# Altium PCB DumbWatch.PcbDoc (part 1 of 2)
Units mil, origin at the board's own origin, x right, y up, seen from the top; angles counter-clockwise.
Board outline 1299.21 x 1299.21 mil, 4 copper layers (Top Layer, Layer 1, Layer 2, Bottom Layer), stack 41.778 mil thick; 57 components, 41 nets, 178 pads, 101 vias.
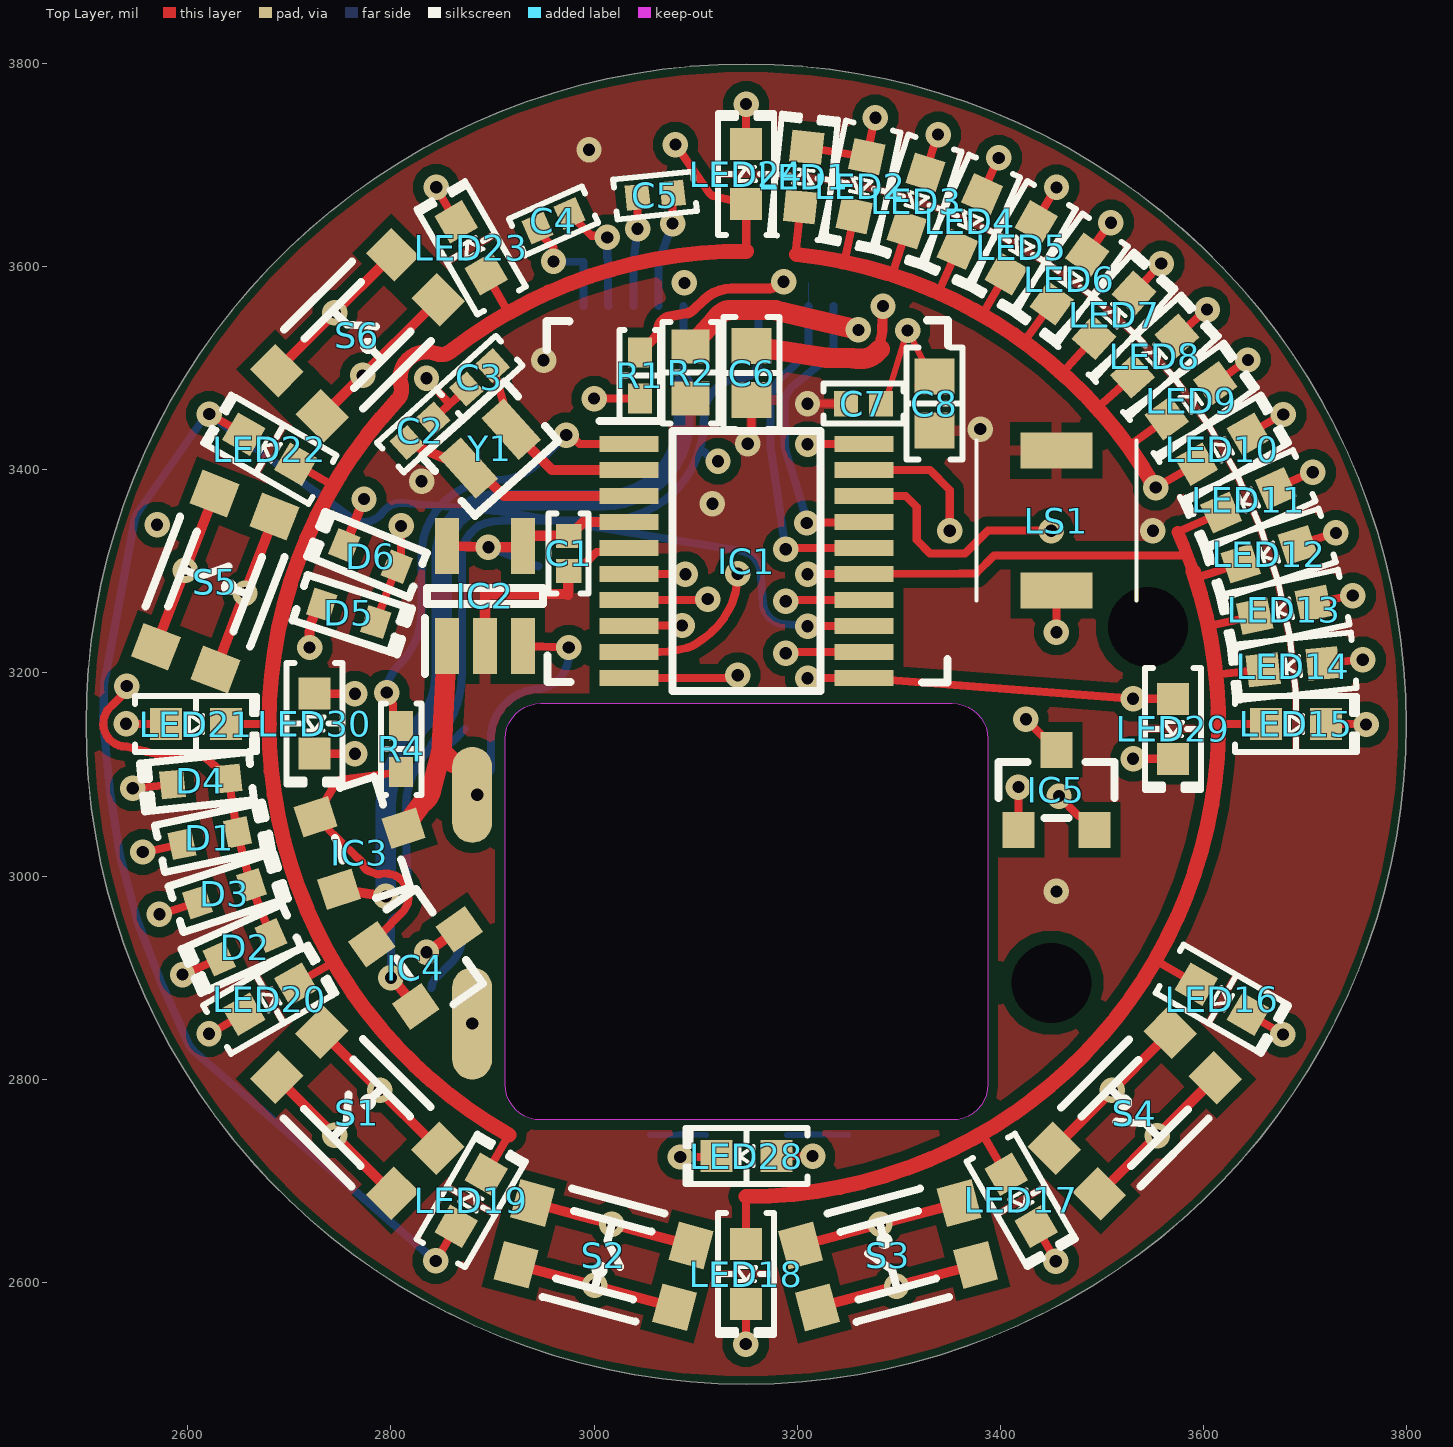
[diagram p0: Top Layer view]
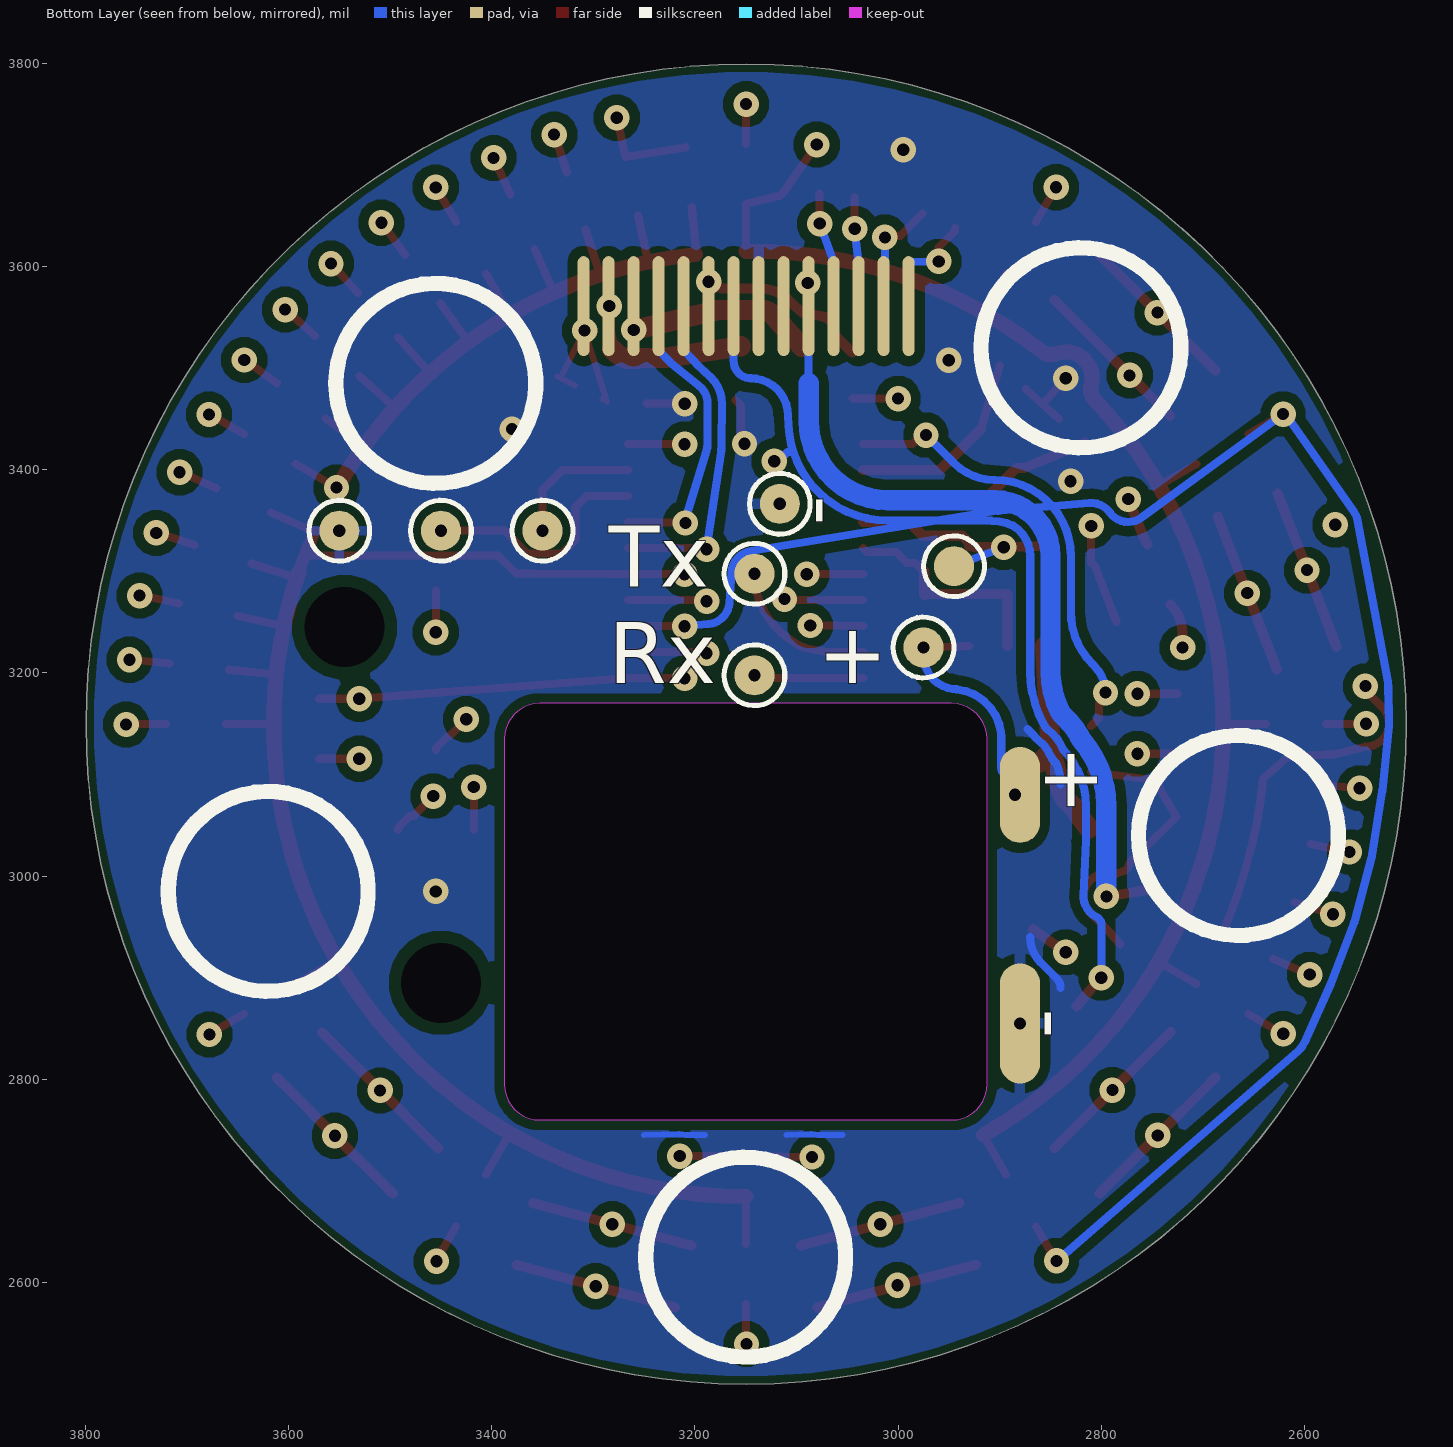
[diagram p1: Bottom Layer view, seen from below]
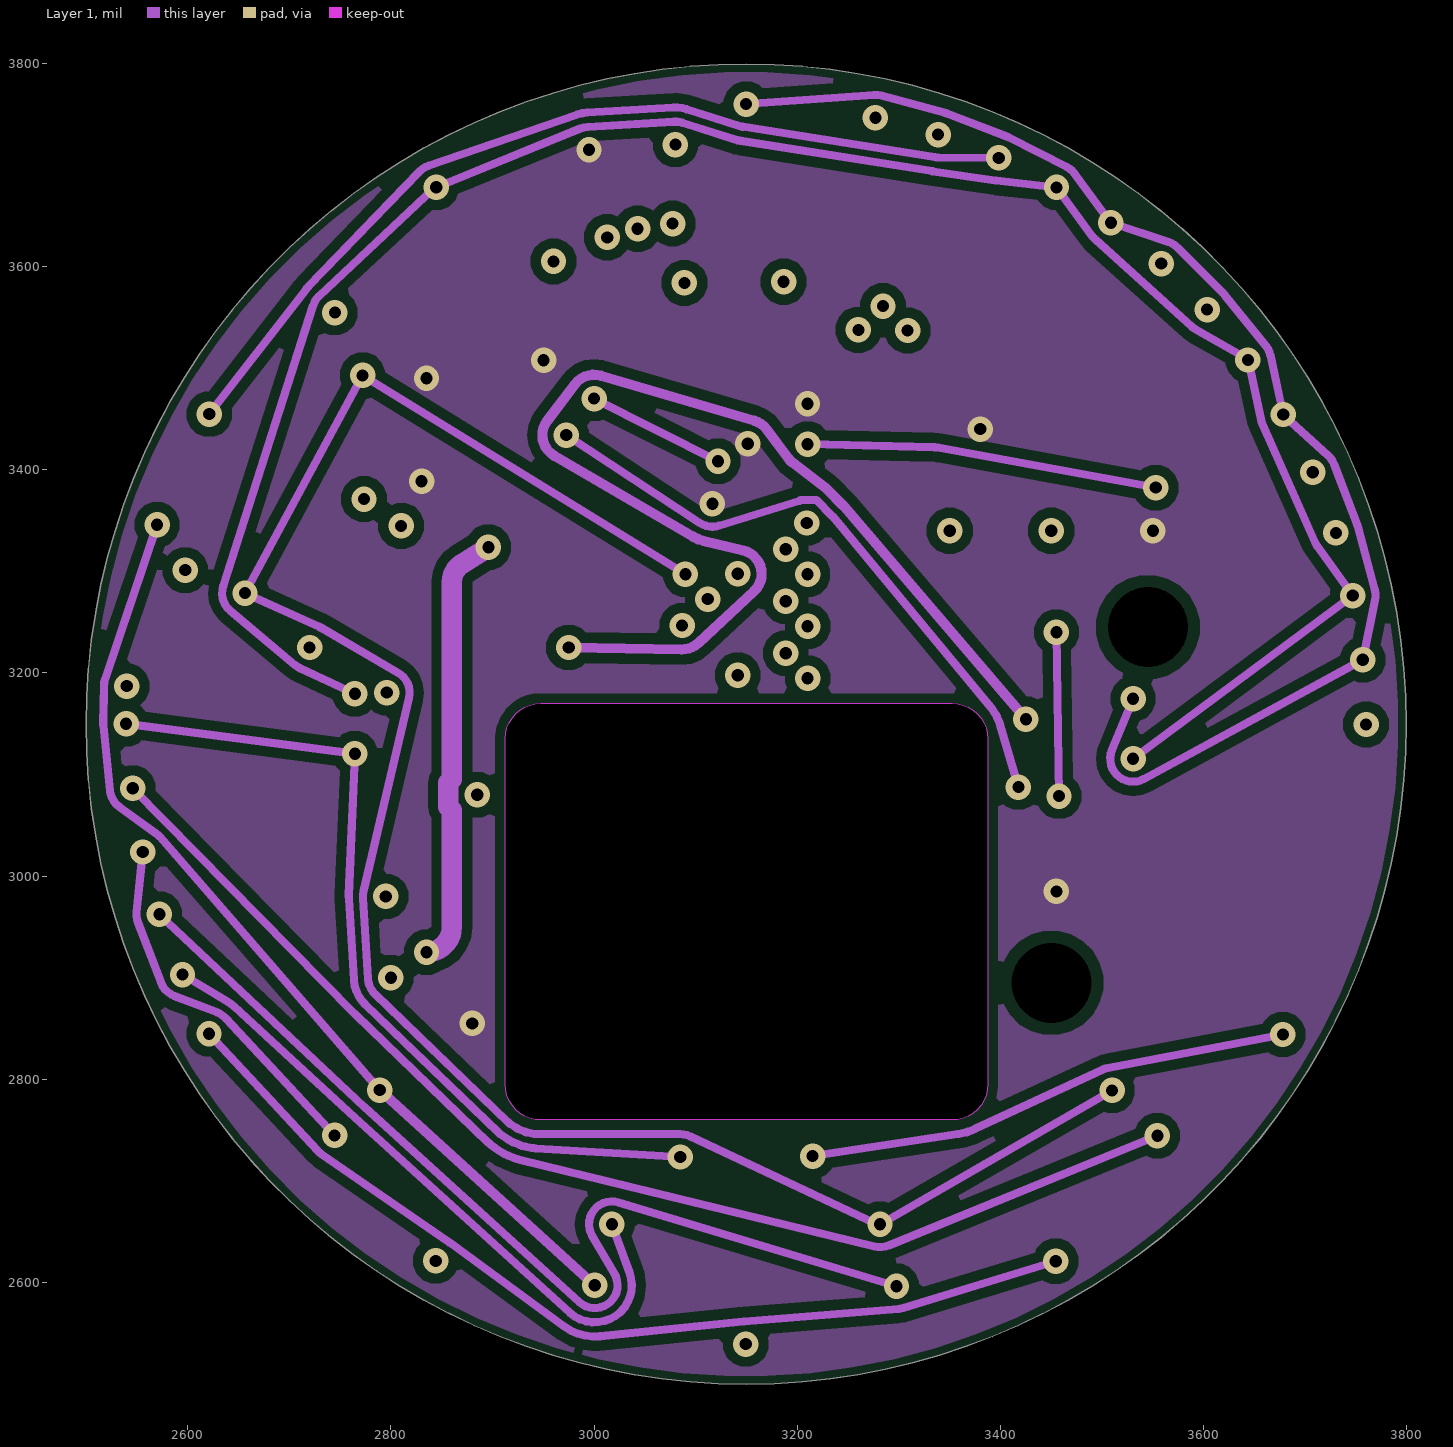
[diagram p2: Layer 1]
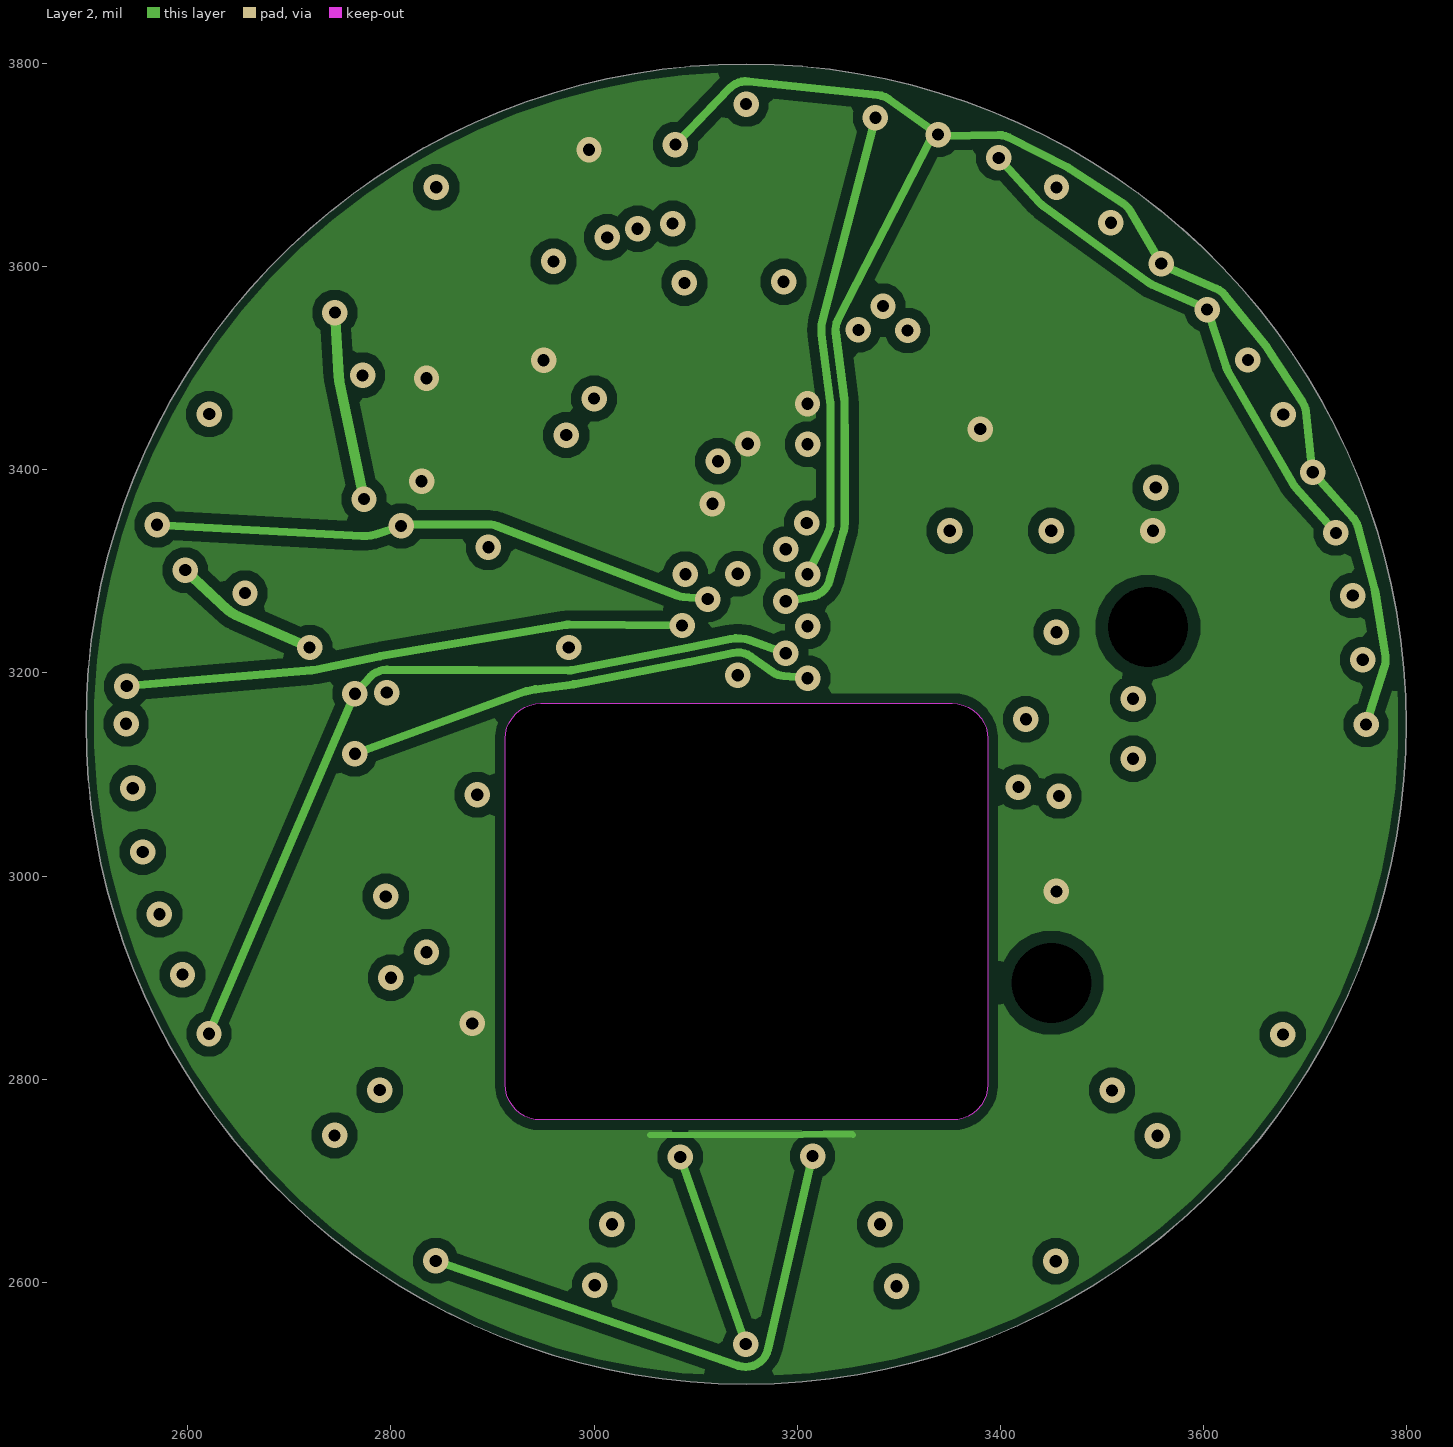
[diagram p3: Layer 2]

## Layer stack, top to bottom
Top Solder: solder mask 0.4, Solder Resist, Dk 3.5
Top Layer: signal copper 1.4
Dielectric 2: prepreg 11.811, PP-006, Dk 4.1
Layer 1: signal copper 1.378
Dielectric 1: dielectric 12.6, FR-4, Dk 4.8
Layer 2: signal copper 1.378
Dielectric 3: prepreg 11.811, PP-006, Dk 4.1
Bottom Layer: signal copper 1.4
Bottom Solder: solder mask 0.4, Solder Resist, Dk 3.5

## Board outline
3149.61,2500 cw(c3149.61,3149.61) 2500,3149.61 cw(c3149.61,3149.61) 3149.61,3799.21 cw(c3149.61,3149.61) 3799.21,3149.61 cw(c3149.61,3149.61)
cut-out: 2947.5,3170 3352.5,3170 cw(c3352.5,3135) 3387.5,3135 3387.5,2795 cw(c3352.5,2795) 3352.5,2760 2947.5,2760 cw(c2947.5,2795) 2912.5,2795 2912.5,3135 cw(c2947.5,3135)

## Design rules (kind name [scope] priority, off if disabled: settings)
BoardOutlineClearance [All] p1: gap=8 ignorepadtopadclearanceinfootprint=FALSE
Clearance [All] p1: gap=10 ignorepadtopadclearanceinfootprint=FALSE except(6: Arc-Arc Arc-Track Arc-THPad Arc-Via Arc-Text Track-Track Track-THPad Track-Via Track-Text SMDPad-SMDPad SMDPad-THPad SMDPad-Via SMDPad-Text THPad-THPad THPad-Via THPad-Text Via-Via Via-Text Fill-Text Poly-Text Region-Text Text-Text; 8: Arc-SMDPad Track-SMDPad; 12: Arc-Hole Track-Hole SMDPad-Hole THPad-Hole Via-Hole Fill-Hole Poly-Hole Region-Hole Text-Hole)
PolygonConnect [All] p1: thpad.connectstyle=Relief thpad.reliefconductorwidth=10 thpad.reliefentries=4 thpad.polygonreliefangle="90 Angle" thpad.airgapwidth=10 smdpad.connectstyle=Relief smdpad.reliefconductorwidth=10 smdpad.reliefentries=4 smdpad.polygonreliefangle="90 Angle" smdpad.airgapwidth=10 via.connectstyle=Direct via.reliefconductorwidth=10 via.reliefentries=4 via.polygonreliefangle="90 Angle" via.airgapwidth=10
RoutingVias [All] p1: holewidth=12 width=25 viastyle="Through Hole" minholewidth=12 minwidth=25 maxholewidth=12 maxwidth=25
SolderMaskExpansion [All] p1: expansion=4 istentingtop=FALSE
Width [All] p1: maxlimit=40 minlimit=6 preferedwidth=6
30 further rules are at their usual default settings.

## Components (designator, comment, footprint, x,y, rotation, side; value= is the part's Value field where it differs from the comment)
C1 "0.1 µF" "CAP 0402_1005" 2975,3317.68 r90 top
C2 "9 pF" "CAP 0402_1005" 2828.77,3438.33 r42 top
C3 "9 pF" "CAP 0402_1005" 2887.14,3490.89 r222 top
C4 "1 µF" "CAP 0402_1005" 2960,3645 r204 top
C5 "1 µF" "CAP 0402_1005" 3060,3670 r186 top
C6 "4.7 µF" "CAP 0603_1608" 3155,3495 r90 top
C7 "0.1 µF" "CAP 0402_1005" 3265,3465 r0 top
C8 "4.7 µF" "CAP 0603_1608" 3335,3465 r90 top
D1 "1N4148X-TP" SOD-523 2621.64,3037.38 r12 top
D2 "1N4148X-TP" SOD-523 2656.51,2930.06 r204 top
D3 "1N4148X-TP" SOD-523 2636.26,2982.81 r18 top
D4 "1N4148X-TP" SOD-523 2612.8,3093.19 r186 top
D5 "1N4148X-TP" SOD-523 2758.42,3258.64 r342 top
D6 "1N4148X-TP" SOD-523 2780,3315 r158 top
IC1 "STM32G031F8P6" CLT34BT6 3150,3310 r0 top
IC2 "ME6211C33M5G-N" SOT95P270X145-5N 2892.6,3275.79 r90 top
IC3 "DMP1045U-7" "DIODES SOT-23-3" 2775,3035 r18 top
IC4 "DMP1045U-7" "DIODES SOT-23-3" 2835,2925 r35.13 top
IC5 "DMP1045U-7" "DIODES SOT-23-3" 3455,3085 r90 top
LED1 "Yellow" "LED 0603_1608 YELLOW" 3206.19,3687.98 r84 top
LED2 "Yellow" "LED 0603_1608 YELLOW" 3262.16,3679.12 r258 top
LED3 "Yellow" "LED 0603_1608 YELLOW" 3316.89,3664.45 r252 top
LED4 "Yellow" "LED 0603_1608 YELLOW" 3369.79,3644.14 r246 top
LED5 "Yellow" "LED 0603_1608 YELLOW" 3420.28,3618.42 r240 top
LED6 "Yellow" "LED 0603_1608 YELLOW" 3467.8,3587.56 r234 top
LED7 "Yellow" "LED 0603_1608 YELLOW" 3511.83,3551.9 r48 top
LED8 "Yellow" "LED 0603_1608 YELLOW" 3551.9,3511.83 r42 top
LED9 "Yellow" "LED 0603_1608 YELLOW" 3587.56,3467.8 r36 top
LED10 "Yellow" "LED 0603_1608 YELLOW" 3618.42,3420.28 r30 top
LED11 "Yellow" "LED 0603_1608 YELLOW" 3644.14,3369.79 r204 top
LED12 "Yellow" "LED 0603_1608 YELLOW" 3664.45,3316.89 r198 top
LED13 "Yellow" "LED 0603_1608 YELLOW" 3679.12,3262.16 r192 top
LED14 "Yellow" "LED 0603_1608 YELLOW" 3687.98,3206.19 r186 top
LED15 "Yellow" "LED 0603_1608 YELLOW" 3690.94,3149.61 r0 top
LED16 "Yellow" "LED 0603_1608 YELLOW" 3618.42,2878.94 r330 top
LED17 "Yellow" "LED 0603_1608 YELLOW" 3420.28,2680.79 r300 top
LED18 "Yellow" "LED 0603_1608 YELLOW" 3149.61,2608.27 r270 top
LED19 "Yellow" "LED 0603_1608 YELLOW" 2878.93,2680.8 r60 top
LED20 "Yellow" "LED 0603_1608 YELLOW" 2680.79,2878.94 r30 top
LED21 "Yellow" "LED 0603_1608 YELLOW" 2608.27,3149.61 r0 top
LED22 "Yellow" "LED 0603_1608 YELLOW" 2680.79,3420.28 r150 top
LED23 "Yellow" "LED 0603_1608 YELLOW" 2878.94,3618.42 r120 top
LED24 "Yellow" "LED 0603_1608 YELLOW" 3149.61,3690.94 r90 top
LED28 "Yellow" "LED 0603_1608 YELLOW" 3150,2724.45 r180.05 top
LED29 "Yellow" "LED 0603_1608 YELLOW" 3570,3145 r270 top
LED30 "Yellow" "LED 0603_1608 YELLOW" 2725,3150 r270 top
LS1 "GSC4317YA-16R4000" GSC4317YA16R4000 3455,3350 r90 top
R1 "5.6 kOhms" "RES 0402_1005" 3045,3492.64 r90 top
R2 "1 MOhms" "RES 0603_1608" 3095,3495.59 r90 top
R4 "5.6 kOhms" "RES 0402_1005" 2810,3125 r270 top
S1 "KMR741NG ULC LFS" "C&K KMR7" 2766.81,2767.1 r314.98 top
S2 "KMR741NG ULC LFS" "C&K KMR7" 3009.35,2626.95 r164.98 top
S3 "KMR741NG ULC LFS" "C&K KMR7" 3289.47,2626.84 r14.98 top
S4 "KMR741NG ULC LFS" "C&K KMR7" 3532.11,2766.81 r44.98 top
S5 "KMR741NG ULC LFS" "C&K KMR7" 2626.95,3289.86 r248.98 top
S6 "KMR741NG ULC LFS" "C&K KMR7" 2767.1,3532.4 r224.98 top
Y1 "32.768 kHz" "ABRACON ABS06" 2897.32,3420.8 r222 top

## Footprints (in the part's own frame and the unit in brackets; to place one, negate y for a bottom-side part, rotate by r counter-clockwise, add the part's x,y. Pads: shape width x height; smd on the part's side, far side on the other; paste and mask are expansions set on the pad)
"ABRACON ABS06" [mm] "Crystal, 2-Leads, Body 1.20x2.00mm, Pitch 1.50mm, IPC Medium Density"
  rect 0.75x1.4 smd: 1(-0.725,0) 2(0.725,0)
  silkscreen extent -1.4,-1 1.4,1, body extent -1.02,-0.62 1.03,0.63, height 0.6
"C&K KMR7" [mm] "T-Switch, 4-leads, body 4.2x2.8mm, C&K KMR741NG ULC LFS"
  rect 0.9x1 smd mask+0.1: 1(-2.05,0.8) 2(2.05,0.8) 3(-2.05,-0.8) 4(2.05,-0.8)
  silkscreen extent -1.2,-1.4 1.2,1.4, body extent -2.3,-1.4 2.3,1.4, height 2.5
"CAP 0402_1005" [mm] "Chip Capacitor, 2-Leads, Body 1.02x0.51mm, IPC Medium Density"
  rect 0.6x0.64 smd: 1(-0.44,0) 2(0.44,0)
  silkscreen extent -1,-0.5 1,0.5, body extent -0.5,-0.26 0.5,0.26, height 0.52
"CAP 0603_1608" [mm] "Chip Capacitor, 2-Leads, Body 1.60x0.80mm, IPC Medium Density"
  rect 0.9x1 smd: 1(-0.675,0) 2(0.675,0)
  silkscreen extent -1.4,-0.7 1.4,0.7, body extent -0.8,-0.41 0.8,0.41, height 0.82
CLT34BT6 [mm]
  rect 1.475x0.4 smd: 1(-2.938,2.925) 2(-2.938,2.275) 3(-2.938,1.625) 4(-2.938,0.975) 5(-2.938,0.325) 6(-2.938,-0.325) 7(-2.938,-0.975) 8(-2.938,-1.625) 9(-2.938,-2.275) 10(-2.938,-2.925) 11(2.938,-2.925) 12(2.938,-2.275) 13(2.938,-1.625) 14(2.938,-0.975) 15(2.938,-0.325) 16(2.938,0.325) 17(2.938,0.975) 18(2.938,1.625) 19(2.938,2.275) 20(2.938,2.925)
  silkscreen extent -3.67,-3.25 1.85,3.5, body extent -3.2,-3.25 3.2,3.25, height 1.2
"DIODES SOT-23-3" [mm] "SOT23, 3-Leads, Body 2.90x2.40mm, Pitch 0.95mm, IPC Medium Density"
  rect 0.9x0.8 smd: 1(-1,0.95) 2(-1,-0.95) 3(1,0)
  silkscreen extent -0.7,-1.45 0.7,1.45, body extent -1.41,-1.45 1.41,1.45, height 1.5
GSC4317YA16R4000 [mm]
  rect 0.9x1.8 smd: 1(-1.75,0) 2(1.75,0)
  silkscreen extent -2,-2 2,2, body extent -2.11,-2 2.11,2, height 2.1
"LED 0603_1608 YELLOW" [mm] "Chip Diode, 2-Leads, Body 1.60x0.80mm, IPC Medium Density"
  rect 0.8x0.8 smd: 1(-0.75,0) 2(0.75,0)
  silkscreen extent -1.52,-0.7 1.52,0.7, body extent -0.8,-0.4 0.8,0.4, height 0.53
"RES 0402_1005" [mm] "Chip Resistor, 2-Leads, Body 1.0x0.5mm, IPC Medium Density"
  rect 0.75x0.6 smd: 1(-0.575,0) 2(0.575,0)
  silkscreen extent -1.14,-0.51 1.14,0.51, body extent -0.5,-0.25 0.5,0.25, height 0.35
"RES 0603_1608" [mm] "Chip Resistor, 2-Leads, Body 1.60x0.80mm, IPC Medium Density"
  rect 0.85x0.95 smd: 1(-0.65,0) 2(0.65,0)
  silkscreen extent -1.27,-0.7 1.27,0.7, body extent -0.8,-0.4 0.8,0.4, height 0.45
SOD-523 [mm] "Molded Diode, 2-Leads, Body 1.60x0.80mm, IPC Medium Density"
  rect 0.6x0.7 smd: 1(-0.71,0) 2(0.71,0)
  silkscreen extent -1.28,-0.6 1.47,0.6, body extent -0.8,-0.4 0.8,0.4, height 0.82
SOT95P270X145-5N [mm]
  rect 1.4x0.6 smd: 1(-1.25,0.95) 2(-1.25,0) 3(-1.25,-0.95) 4(1.25,-0.95) 5(1.25,0.95)
  silkscreen extent -1.95,-1.45 0.2,1.5, body extent -1.35,-1.45 1.35,1.45, height 1.45

## Part data
C1 C7: library part C0402C104M3PAC7867, "CAP CER 0.1UF 25V X5R 0402", Device Package="0402 (1005 Metric)", Manufacturer=KEMET, Operating Temperature="-55°C ~ 85°C", Supplier Part Number 1=399-15637-1-ND, Temperature Coefficient=X5R, Tolerance=±20%, Voltage - Rated=25V, Applications="Bypass, Decoupling", Capacitance="0.1 µF", ComponentLink1Description=Datasheet, ComponentLink1URL=https://api.kemet.com/component-edge/download/datasheet/C0402C104M3PAC7867.pdf, ComponentLink2Description="DigiKey Link", ComponentLink2URL=https://www.digikey.com/en/products/detail/kemet/C0402C104M3PAC7867/7390685, LastUpdated="4/6/2026 7:11:09 PM", Lifecycle Status=Active, Minimum Order=1, Mounting Type="Surface Mount, MLCC", Package / Case="0402 (1005 Metric)", Packaging=TapeAndReel, Part Number=C0402C104M3PAC7867, Part Status=Active, PartId=2096, Price=0.01, Series="SMD Comm X5R", Size / Dimension="0.039\" L x 0.020\" W (1.00mm x 0.50mm)", Supplier 1=DigiKey, Thickness (Max)="0.022\" (0.55mm)"
C2 C3: library part GCQ1555C1H9R0BB01D, "CAP CER 9PF 50V C0G/NP0 0402", Device Package="0402 (1005 Metric)", Manufacturer="Murata Electronics", Operating Temperature="-55°C ~ 125°C", Ratings=AEC-Q200, Supplier Part Number 1=490-17523-1-ND, Temperature Coefficient="C0G, NP0", Tolerance=±0.1pF, Voltage - Rated=50V, Applications="RF, Microwave, High Frequency, Automotive", Capacitance="9 pF", ComponentLink1Description=Datasheet, ComponentLink1URL=https://search.murata.co.jp/Ceramy/image/img/A01X/G101/ENG/GCQ1555C1H9R0BB01-01.pdf, ComponentLink2Description="DigiKey Link", ComponentLink2URL=https://www.digikey.com/en/products/detail/murata-electronics/GCQ1555C1H9R0BB01D/7803116, LastUpdated="4/6/2026 7:10:26 PM", Lifecycle Status=Active, Minimum Order=1, Mounting Type="Surface Mount, MLCC", Package / Case="0402 (1005 Metric)", Packaging=TapeAndReel, Part Number=GCQ1555C1H9R0BB01D, Part Status=Active, PartId=12256, Price=0.04, Series=GCQ, Size / Dimension="0.039\" L x 0.020\" W (1.00mm x 0.50mm)", Supplier 1=DigiKey, Thickness (Max)="0.022\" (0.55mm)"
C4 C5: library part GMC04X5R105K25NT, "CAP0402 X5R 1UF 10% 25V", Device Package="0402 (1005 Metric)", Manufacturer="Cal-Chip Electronics, Inc.", Operating Temperature="-55°C ~ 85°C", Supplier Part Number 1=4713-GMC04X5R105K25NTCT-ND, Temperature Coefficient=X5R, Tolerance=±10%, Voltage - Rated=25V, Applications="General Purpose", Capacitance="1 µF", ComponentLink1Description=Datasheet, ComponentLink1URL=https://calchip.com/wp-content/uploads/2023/09/GMC-Series-2.pdf, ComponentLink2Description="DigiKey Link", ComponentLink2URL=https://www.digikey.com/en/products/detail/cal-chip-electronics-inc/GMC04X5R105K25NT/23571683, LastUpdated="4/6/2026 7:07:11 PM", Lifecycle Status=Active, Minimum Order=1, Mounting Type="Surface Mount, MLCC", Package / Case="0402 (1005 Metric)", Packaging=TapeAndReel, Part Number=GMC04X5R105K25NT, PartId=62676, Price=0.01, Series=GMC, Size / Dimension="0.039\" L x 0.020\" W (1.00mm x 0.50mm)", Supplier 1=DigiKey, Thickness (Max)="0.022\" (0.55mm)"
C6 C8: library part CL10A475KA8NQNC, "CAP CER 4.7UF 25V X5R 0603", Device Package="0603 (1608 Metric)", Manufacturer="Samsung Electro-Mechanics", Operating Temperature="-55°C ~ 85°C", Supplier Part Number 1=1276-1900-1-ND, Temperature Coefficient=X5R, Tolerance=±10%, Voltage - Rated=25V, Applications="General Purpose", Capacitance="4.7 µF", ComponentLink1Description=Datasheet, ComponentLink1URL=http://www.samsungsem.com/kr/support/product-search/mlcc/CL10A475KA8NQNC.jsp, ComponentLink2Description="DigiKey Link", ComponentLink2URL=https://www.digikey.com/en/products/detail/samsung-electro-mechanics/CL10A475KA8NQNC/3887558, LastUpdated="4/6/2026 7:23:52 PM", Lifecycle Status=Active, Minimum Order=1, Mounting Type="Surface Mount, MLCC", Package / Case="0603 (1608 Metric)", Packaging=TapeAndReel, Part Number=CL10A475KA8NQNC, Part Status=Active, PartId=2349, Price=0.06, Series=CL, Size / Dimension="0.063\" L x 0.031\" W (1.60mm x 0.80mm)", Supplier 1=DigiKey, Thickness (Max)="0.035\" (0.90mm)"
D1 D2 D3 D4 D5 D6: "DIODE GEN PURP 75V 150MA SOD523", Capacitance @ Vr, F="2pF @ 0V, 1MHz", Current - Average Rectified (Io)=150mA, Current - Reverse Leakage @ Vr="1 µA @ 75 V", Manufacturer="Micro Commercial Co", Operating Temperature - Junction="-65°C ~ 150°C", Package / Case="SC-79, SOD-523", Supplier Device Package=SOD-523, Supplier Part Number 1=1N4148XTPMSCT-ND, Voltage - DC Reverse (Vr) (Max)="75 V", Voltage - Forward (Vf) (Max) @ If="1.25 V @ 150 mA", ComponentLink1Description=Datasheet, ComponentLink1URL=https://www.mccsemi.com/pdf/Products/1N4148X(SOD-523).PDF, ComponentLink2Description="DigiKey Link", ComponentLink2URL=https://www.digikey.com/en/products/detail/micro-commercial-co/1N4148X-TP/789328, Diode Type=Standard, LastUpdated="4/5/2026 8:44:43 PM", Lifecycle Status=Active, Minimum Order=1, Mounting Type="Surface Mount", Packaging=TapeAndReel, Part Number=1N4148X-TP, Part Status=Active, PartId=2733, Price=0.02, Reverse Recovery Time (trr)="4 ns", Series=-, Speed="Small Signal =< 200mA (Io), Any Speed", Supplier 1=DigiKey
IC1: "Integrated Circuit", Manufacturer_Name=STMicroelectronics, Mouser Part Number=511-STM32G031F8P6, Arrow Part Number=STM32G031F8P6, Arrow Price/Stock=https://www.arrow.com/en/products/stm32g031f8p6/stmicroelectronics.html?utm_currency=USD&region=asia, Datasheet Link=https://www.st.com/resource/en/datasheet/stm32g031c6.pdf, Height=1.2mm, Manufacturer_Part_Number=STM32G031F8P6, Mouser Price/Stock=https://www.mouser.co.uk/ProductDetail/STMicroelectronics/STM32G031F8P6?qs=uwxL4vQweFPCanBqg1D5fQ%3D%3D
IC2: "Integrated Circuit", Manufacturer_Name=Microne, Datasheet Link=https://datasheet.lcsc.com/szlcsc/1811131510_MICRONE-Nanjing-Micro-One-Elec-ME6211C33M5G-N_C82942.pdf, Height=1.45mm, Manufacturer_Part_Number=ME6211C33M5G-N
IC3 IC4 IC5: "MOSFET P-CH 12V 4A SOT23", Current - Continuous Drain (Id) @ 25°C="4A (Ta)", Drain to Source Voltage (Vdss)="12 V", Drive Voltage (Max Rds On,  Min Rds On)="1.8V, 4.5V", Input Capacitance (Ciss) (Max) @ Vds="1357 pF @ 10 V", Manufacturer="Diodes Incorporated", Operating Temperature="-55°C ~ 150°C (TJ)", Package / Case="TO-236-3, SC-59, SOT-23-3", Power Dissipation (Max)="800mW (Ta)", Supplier Device Package=SOT-23-3, Supplier Part Number 1=DMP1045U-7DICT-ND, ComponentLink1Description=Datasheet, ComponentLink1URL=https://www.diodes.com/assets/Datasheets/DMP1045U.pdf, ComponentLink2Description="DigiKey Link", ComponentLink2URL=https://www.digikey.com/en/products/detail/diodes-incorporated/DMP1045U-7/4249936, FET Type=P-Channel, Gate Charge (Qg) (Max) @ Vgs="15.8 nC @ 4.5 V", LastUpdated="2/8/2024 9:46:13 PM", Lifecycle Status=Active, Minimum Order=1, Mounting Type="Surface Mount", Packaging=TapeAndReel, Part Number=DMP1045U-7, Part Status=Active, Price=0.07, Rds On (Max) @ Id, Vgs="31mOhm @ 4A, 4.5V", Series=-, Supplier 1=DigiKey, Technology="MOSFET (Metal Oxide)", Vgs (Max)=±8V, Vgs(th) (Max) @ Id="1V @ 250µA"
LED1 LED2 LED3 LED4 LED5 LED6 LED7 LED8 LED9 LED10 LED11 LED12 LED13 LED14 LED15 LED16 LED17 LED18 LED19 LED20 LED21 LED22 LED23 LED24 LED28 LED29 LED30: library part QBLP601-Y5-2897, "0603 LED YELLOW 590NM, CLEAR LEN", Current - Test=5mA, Device Package="0603 (1608 Metric)", Lens Color=Colorless, Manufacturer="QT Brightek (QTB)", Millicandela Rating=104mcd, Supplier Device Package=0603, Supplier Part Number 1=1516-QBLP601-Y5-2897CT-ND, Voltage - Forward (Vf) (Typ)=1.9V, Color=Yellow, ComponentLink1Description=Datasheet, ComponentLink1URL=https://www.qt-brightek.com/datasheet/QBLP601-Y5-2897.pdf, ComponentLink2Description="DigiKey Link", ComponentLink2URL=https://www.digikey.com/en/products/detail/qt-brightek-qtb/QBLP601-Y5-2897/22106639, Configuration=Standard, Height (Max)=0.70mm, LastUpdated="4/5/2026 8:39:54 PM", Lens Size="1.10mm x 0.80mm", Lens Style="Rectangle with Flat Top", Lens Transparency=Clear, Lifecycle Status=Active, Minimum Order=1, Mounting Type="Surface Mount", Package / Case="0603 (1608 Metric)", Packaging=TapeAndReel, Part Number=QBLP601-Y5-2897, PartId=1491, Price=0.06, Series=QBLP601, Size / Dimension="1.60mm L x 0.80mm W", Supplier 1=DigiKey, Viewing Angle=140°, Wavelength - Dominant=590nm, Wavelength - Peak=592nm
LS1: "Loudspeaker or Buzzer", Manufacturer_Name=INGHAi, Datasheet Link=https://datasheet.lcsc.com/szlcsc/1810191428_INGHAi-GSC4317YA-16R4000_C255307.pdf, Height=2mm, Manufacturer_Part_Number=GSC4317YA-16R4000
R1 R4: library part CR0402-FX-5601GLF, "RES SMD 5.6K OHM 1% 1/16W 0402", Device Package="0402 (1005 Metric)", Manufacturer="Bourns Inc.", Operating Temperature="-55°C ~ 155°C", Power (Watts)="0.063W, 1/16W", Supplier Device Package=0402, Supplier Part Number 1=CR0402-FX-5601GLFCT-ND, Temperature Coefficient=±100ppm/°C, Tolerance=±1%, ComponentLink1Description=Datasheet, ComponentLink1URL=https://www.bourns.com/docs/Product-Datasheets/CR0402.pdf, ComponentLink2Description="DigiKey Link", ComponentLink2URL=https://www.digikey.com/en/products/detail/bourns-inc/CR0402-FX-5601GLF/3783426, Composition="Thick Film", Height - Seated (Max)="0.016\" (0.40mm)", LastUpdated="2/9/2024 8:30:06 PM", Lifecycle Status=Active, Minimum Order=1, Number of Terminations=2, Package / Case="0402 (1005 Metric)", Packaging=CutTape, Part Number=CR0402-FX-5601GLF, Part Status=Active, PartId=6632, Price=0.01, Resistance="5.6 kOhms", Series=CR0402, Size / Dimension="0.039\" L x 0.020\" W (1.00mm x 0.50mm)", Supplier 1=DigiKey
R2: library part ERJ-3EKF1004V, "RES SMD 1M OHM 1% 1/10W 0603", Device Package="0603 (1608 Metric)", Manufacturer="Panasonic Electronic Components", Operating Temperature="-55°C ~ 155°C", Power (Watts)="0.1W, 1/10W", Ratings=AEC-Q200, Supplier Device Package=0603, Supplier Part Number 1=P1.00MHCT-ND, Temperature Coefficient=±100ppm/°C, Tolerance=±1%, ComponentLink1Description=Datasheet, ComponentLink1URL=https://industrial.panasonic.com/cdbs/www-data/pdf/RDA0000/AOA0000C304.pdf, ComponentLink2Description="DigiKey Link", ComponentLink2URL=https://www.digikey.com/en/products/detail/panasonic-electronic-components/ERJ-3EKF1004V/196033, Composition="Thick Film", Features="Automotive AEC-Q200", Height - Seated (Max)="0.022\" (0.55mm)", LastUpdated="2/9/2024 8:42:00 PM", Lifecycle Status=Active, Minimum Order=1, Number of Terminations=2, Package / Case="0603 (1608 Metric)", Packaging=TapeAndReel, Part Number=ERJ-3EKF1004V, Part Status=Active, PartId=25691, Price=0.01, Resistance="1 MOhms", Series=ERJ-3EK, Size / Dimension="0.063\" L x 0.031\" W (1.60mm x 0.80mm)", Supplier 1=DigiKey
S1 S2 S3 S4 S5 S6: "SWITCH TACTILE SPST-NO 50MA 32V", Contact Rating @ Voltage="0.05A @ 32VDC", Manufacturer=C&K, Operating Force=400gf, Operating Temperature="-40°C ~ 85°C", Supplier Part Number 1=CKN10688CT-ND, Actuator Height off PCB, Vertical=2.50mm, Actuator Orientation="Top Actuated", Actuator Type=Standard, Circuit=SPST-NO, ComponentLink1Description=Datasheet, ComponentLink1URL=https://dznh3ojzb2azq.cloudfront.net/products/Tactile/KMR7/documents/datasheet.pdf, ComponentLink2Description="DigiKey Link", ComponentLink2URL=http://digikey.com/product-detail/en/c-k/KMR741NG-ULC-LFS/CKN10688CT-ND/6035360, Illumination=Non-Illuminated, Ingress Protection="IP67 - Dust Tight, Waterproof", LastUpdated="4/9/2020 10:01:05 AM", Lifecycle Status=Active, Minimum Order=1, Mounting Type="Surface Mount", Outline="4.20mm x 2.80mm", Packaging=TapeAndReel, Part Number="KMR741NG ULC LFS", Part Status=Active, Price=0.16, Series=KMR7, Supplier 1=DigiKey, Switch Function=Off-Mom, Termination Style="Gull Wing"
Y1: library part ABS06-32.768KHZ-9-1-T, "CRYSTAL 32.7680KHZ 9PF SMD", ESR (Equivalent Series Resistance)="90 kOhms", Frequency Tolerance=±10ppm, Load Capacitance=9pF, Manufacturer="Abracon LLC", Operating Mode=Fundamental, Operating Temperature="-40°C ~ 85°C", Package / Case="2-SMD, No Lead", Supplier Part Number 1=535-10247-1-ND, ComponentLink1Description=Datasheet, ComponentLink1URL=https://abracon.com/Resonators/ABS06.pdf, ComponentLink2Description="DigiKey Link", ComponentLink2URL=https://www.digikey.com/en/products/detail/abracon-llc/ABS06-32-768KHZ-9-1-T/2217993, Frequency="32.768 kHz", Height - Seated (Max)="0.024\" (0.60mm)", LastUpdated="4/5/2026 8:41:05 PM", Lifecycle Status=Active, Minimum Order=1, Mounting Type="Surface Mount", Packaging=TapeAndReel, Part Number=ABS06-32.768KHZ-9-1-T, Part Status=Active, PartId=371, Price=0.49, Series=ABS06, Size / Dimension="0.079\" L x 0.047\" W (2.00mm x 1.20mm)", Supplier 1=DigiKey, Type="kHz Crystal (Tuning Fork)"

## Free pads (board coordinates)
  round 39.37 hole 78.74 unplated: 0(3450,2895) 0(3545,3245)
  oval 11.81x98.43 smd far side paste+0 mask+2: 1(2989.67,3561.02) 2(3014.27,3561.02) 3(3038.88,3561.02) 4(3063.48,3561.02) 5(3088.09,3561.02) 6(3112.7,3561.02) 7(3137.3,3561.02) 8(3161.91,3561.02) 9(3186.52,3561.02) 10(3211.12,3561.02) 11(3235.73,3561.02) 12(3260.33,3561.02) 13(3284.94,3561.02) 14(3309.55,3561.02)
  oval 39.37x94.49 smd paste+0 mask+2: 15(2880,3080)
  oval 39.37x94.49 smd far side paste+0 mask+2: 15(2880,3080)
  oval 39.37x110.24 smd paste+0 mask+2: 16(2880,2855)
  oval 39.37x118.11 smd far side paste+0 mask+2: 16(2880,2855)
  round 39.37 smd far side paste+0 mask+2: 17(2945,3305) 17(2975,3225) 17(3116.42,3366.42) 17(3141.38,3197.65) 17(3141.38,3297.65) 17(3350,3340) 17(3450,3340) 17(3550,3340)

## Via types
v1: diameter 25, hole 12, Top Layer to Bottom Layer, tented both sides, 96 vias
v2: diameter 25, hole 12, Top Layer to Bottom Layer, tented top, 3 vias
v3: diameter 25, hole 12, Top Layer to Bottom Layer, 2 vias

## Nets (pads, with @x,y where several pads share a name; then routed paths per layer and width w, separated by ;. In a path a pad name is that pad's centre, name@x,y a point inside that pad or via, vN(x,y) a via of type N, cw(c..) or ccw(c..) an arc to the next point about the centre after c; other vN are vias at no path point)
3V3: C1.2 IC1.4 IC2.4 IC2.5 IC4.3 pad.17@2945,3305 | length 717.6
  Top Layer w8: IC1.4 IC1.4@3035.14,3349.19
  Top Layer w10: v1(2835,2925) 2856.8,2940.34 IC4.3 ; IC2.5 2862.01,3324.77 v1(2895.96,3323.63) 2923.19,3323.63 IC2.4 2930,3328.19 2936.81,3335 C1.2 2975.79,3335 2989.17,3348.39 IC1.4
  Layer 1 w20: v1(2835,2925) ccw(c2835,2950) 2860,2950 2860,3064.7 2856.5,3068.2 2856.5,3091.8 2860,3095.3 2860,3290 cw(c2880,3290) 2869.37,3306.94 v1(2895.96,3323.63)
  Bottom Layer w8: v1(2895.96,3323.63) pad.17@2945,3305
3V3_oled: IC4.2 pad.8 R1.1 | length 1134.7
  Top Layer w8: v1(3000,3470) R1.1
  Top Layer w10: v1(2800,2900) 2805,2895 2817.43,2880.05 IC4.2
  Layer 1 w8: v1(3000,3470) v1(3121.92,3408.36)
  Bottom Layer w8: v1(2800,2900) 2800,2953.25 2800.18,2954.08 cw(c2808,2952.41) 2804.63,2959.66 ccw(c2795,2980) 2811.94,2965.2 ccw(c2795,2980) 2817.47,2981.11 2815,3034.96 ; 2815,3035 2815,3068.58 cw(c2895,3068.58) 2834.22,3120.6 cw(c2895,3068.58) 2834.27,3120.65 cw(c2895,3068.58) 2836.42,3123.06 ccw(c2830.58,3128.53) 2837.94,3125.39 cw(c2880,3107.56) 2852.76,3144.23 2853.06,3144.46 ccw(c2848.29,3150.88) 2855.01,3146.55 2855.1,3146.68 ccw(c2762.22,3201.36) 2855.19,3146.83 ccw(c2762.22,3201.36) 2857.52,3151.03 ccw(c2762.22,3201.36) 2870,3201.36 2870,3315 cw(c2905,3315) 2886.28,3344.57 cw(c2890.53,3337.79) 2887.06,3345 cw(c2907.45,3302.16) 2907.45,3349.61 cw(c2909.92,3342) 2909.92,3350 3010,3350 ccw(c3010,3447.96) 3095.38,3399.92 ccw(c3010,3447.96) 3107.85,3443.24 3108.35,3453.34 cw(c3145,3453.36) 3145,3490 ccw(c3145,3506.91) 3161.91,3506.91 pad.8 ; 3104.17,3417.58 3108.73,3417.58 3117.95,3408.36 v1(3121.92,3408.36)
BTN1: D1.2 D2.1 D3.2 D4.1 IC1.8 | length 955.4
  Top Layer w8: 2526.85,3169.3 2521.77,3164.22 ccw(c2527.45,3158.59) 2520.29,3162.16 2519.24,3160.06 ccw(c2539.37,3150) 2539.28,3127.5 cw(c2539.23,3119.5) 2541.18,3127.26 2556.9,3123.3 cw(c2554.98,3115.53) 2558.16,3122.87 ccw(c2562.99,3133.86) 2560.4,3122.14 2569.48,3120.13 ccw(c2571.21,3127.95) 2570.73,3119.96 2613.61,3117.63 cw(c2613.21,3109.64) 2618.51,3115.63 2631.94,3103.76 D4.1 ccw(c3149.61,3149.61) D2.1 ; 2526.85,3169.34 2540.05,3182.54 v1(2540.05,3186.99) ; IC1.8 3059.37,3246.63 v1(3086.57,3246.7)
  Layer 2 w8: v1(2540.05,3186.99) 2721.92,3202.58 ccw(c2720,3225) 2724.6,3202.97 2788.45,3216.31 cw(c2795.91,3180.58) 2789.84,3216.57 2971.26,3247.19 cw(c2975,3225) 2975.16,3247.5 v1(3086.57,3246.7)
BTN2: D5.2 D6.1 IC1.7 S1.1 S1.2 S2.1 S2.2 | length 2012.5
  Top Layer w8: D5.2 2788.51,3259.14 2802.41,3295.4 D6.1 2810,3308.62 v1(2810,3344.74) ; IC1.7 3110.81,3271.61 v1(3111.81,3272.61)
  Top Layer w10: S1.1 2741.03,2837.46 v1(2789.09,2789.36) 2837.15,2741.27 S1.2 ; S2.2 2935.52,2614.15 2968.22,2605.38 ccw(c2970.77,2615.05) 2968.36,2605.34 v1(3000.58,2597.35) ; v1@3001.19,2596.53 3066.86,2578.91 S2.1
  Layer 1 w8: v1(2569.81,3345.75) 2518.73,3194.18 ccw(c2540.05,3186.99) 2517.55,3187.4 2516.87,3150.41 ccw(c2539.37,3150) 2516.99,3147.73 2523.42,3084.27 ccw(c2545.81,3086.54) 2532.6,3068.33 2568.92,3041.99 cw(c2555.71,3023.77) 2572.69,3038.53 ; 2572.69,3038.53 v1(2789.09,2789.36)
  Layer 1 w10: v1(2789.09,2789.36) v1(3000.58,2597.35)
  Layer 2 w8: v1(2569.81,3345.75) 2771.5,3334.63 ccw(c2773.51,3371.07) 2784.71,3336.33 2808.21,3343.9 ccw(c2805.75,3351.52) v1(2810,3344.74) ; v1(2810,3344.74) cw(c2814.27,3337.97) 2814.25,3345.97 2895.92,3346.13 cw(c2895.96,3323.63) 2904.06,3344.63 3081.76,3276.21 ccw(c3089.84,3297.2) 3087.8,3274.8 v1(3111.81,3272.61)
BTN3: IC1.6 S3.1 S3.2 S4.1 S4.2 S5.1 S5.2 S6.1 S6.2 | length 2649.8
  Top Layer w8: IC1.6 v1(3089.84,3297.2)
  Top Layer w10: S5.2 2631.96,3215.1 v1(2656.35,3278.56) 2680.74,3342.03 S5.1 ; S6.2 2741.27,3462.06 v1(2772.11,3492.89) 2837.46,3558.18 S6.1 ; S3.1 3215.65,2639.7 v1(3281.33,2657.27) 3347.01,2674.84 S3.2 ; S4.1 3461.76,2741.03 v1(3509.85,2789.09) 3557.95,2837.15 S4.2
  Layer 1 w8: v1(3089.84,3297.2) v1(2772.11,3492.89) v1(2656.35,3278.56) 2729.29,3245.49 cw(c2720,3225) 2731.36,3244.42 2807.28,3200 cw(c2795.91,3180.58) 2817.82,3175.43 2773.1,2985.15 ccw(c2795,2980) 2772.54,2978.6 2777.54,2898.6 ccw(c2800,2900) 2784.44,2883.75 2915.48,2757.72 ccw(c2925.19,2767.81) 2917.38,2756.2 2923.18,2752.32 ccw(c2930.92,2763.98) 2925.56,2751.05 2931.97,2748.39 ccw(c2937.29,2761.34) 2934.56,2747.61 2941.32,2746.27 ccw(c2944.05,2760) 2944.05,2746 3084.79,2746 cw(c3084.79,2723.5) 3094.38,2743.85 3276.1,2658.19 ccw(c3279.48,2665.44) 3278.85,2657.46 v1(3281.33,2657.27) v1(3509.85,2789.09)
GND: C1.1 C2.2 C3.2 C6.1 C7.1 C8.1 IC1.5 IC2.2 LS1.2 pad.7 pad.16 pad.17@3116.42,3366.42 pad.17@3550,3340 R2.1 | length 830.9
  Top Layer w8: v1(2835,3490) 2857.95,3464.61 ; C2.2 2847.45,3455.15 2857.95,3464.61 ; C3.2 2868.46,3474.07 2857.95,3464.61 ; C1.1 2982.81,3308.17 2991.41,3308.17 3002.17,3318.92 3030.46,3318.92 IC1.5 ; v1(3151.16,3425.6) 3154.41,3428.85 3154.41,3439.07 3154.79,3439.46 3154.79,3463.22 C6.1@3160,3468.43 ; v1(3210,3465) 3239.87,3465 C7.1
  Top Layer w10: IC2.2 2892.6,3277.6 2972.4,3277.6 cw(c2972.4,3275) 2974.21,3276.86 2974.21,3300.35 C1.1
  Layer 2 w6: 3055,2745 3205.12,2745 3206.09,2745.97 3254.03,2745.97 3255,2745
  Bottom Layer w6: 3055,2745 3077.79,2745 ccw(c3077.75,2751) 3079.31,2745.2 cw(c3085,2724.47) 3085.91,2745.95 3109.99,2745 ; 3190,2745 3207.78,2745 ccw(c3207.75,2751) 3209.3,2745.2 cw(c3215,2724.47) 3215.71,2745.96 3249.98,2745
  Bottom Layer w8: 2840,2890 cw(c2852.72,2890) 2843.73,2899 2859.58,2914.86 ccw(c2834.44,2940) 2870,2940 ; 2840,3090 cw(c2894.33,3090) 2843.51,3109.2 cw(c2850.98,3106.34) 2844.88,3111.52 cw(c2895,3068.58) 2846.73,3113.58 ccw(c2830.58,3128.53) 2850.81,3119.88 cw(c2880,3107.56) 2861.34,3133.17 ccw(c2848.29,3150.88) 2866.84,3139.05 ; 2867.02,3139.34 cw(c2855.1,3146.68) 2866.84,3139.05 ; 2872.69,3144.9 2866.84,3139.05
  other v1: 3455,2985 3550,3340 3116.42,3366.42 2830.25,3388.59 3380,3440 2950.25,3507.76 2995,3715
  other v3: 2880,2855
GPIO6/SDA: 
GPIO7/SCL: 
I2C2_SCL: IC1.16 pad.10 | length 332.1
  Top Layer w8: v1(3188.52,3321.64) 3189.68,3322.8 IC1.16
  Bottom Layer w8: v1(3188.52,3321.64) 3174.05,3419.83 cw(c3210.16,3425.16) 3173.66,3425.01 3173.5,3464.86 cw(c3210,3465) 3184.88,3491.48 3198.84,3504.73 ccw(c3186.52,3517.72) 3199.55,3505.43 3211.12,3517.72 pad.10
I2C2_SDA: IC1.17 pad.11 | length 294.3
  Top Layer w8: v1(3209.37,3347.6) 3209.76,3347.99 3265.28,3347.99 IC1.17
  Bottom Layer w8: v1(3209.37,3347.6) 3210.16,3348.39 3188.65,3418.56 cw(c3210.16,3425.16) 3187.66,3425.07 3187.5,3464.91 cw(c3210,3465) 3195.91,3482.55 3222.33,3503.75 ccw(c3211.12,3517.72) 3224.15,3505.43 3235.73,3517.72 pad.11
NetC2_1: C2.1 IC1.3 Y1.2 | length 234.9
  Top Layer w10: C2.1 2823.66,3423.51 2855.11,3410.43 Y1.2 2883.61,3401.7 2911.33,3373.98 IC1.3
NetC3_1: C3.1 IC1.2 Y1.1 | length 197.8
  Top Layer w8: C3.1 2902.72,3493.34 2911.44,3463.86 Y1.1
  Top Layer w10: Y1.1 2958.87,3399.57 IC1.2
NetC4_1: C4.1 pad.2 | length 115
  Top Layer w8: C4.1 2997.53,3630.34 3011.33,3630.34 v1(3012.97,3628.7)
  Bottom Layer w8: v1(3012.97,3628.7) 3012.97,3608.33 3013.54,3607.75 3013.54,3561.75 pad.2
NetC4_2: C4.2 pad.1 | length 112.5
  Top Layer w8: C4.2 2944.18,3634.82 2960,3619 v1(2960,3605)
  Bottom Layer w8: v1(2960,3605) 2989.67,3604.33 pad.1
NetC5_1: C5.1 pad.4 | length 113.2
  Top Layer w8: C5.1 3077.27,3671.77 v1@3077.27,3642.27 ; v1(3077.23,3642.23) v1@3077.27,3642.27
  Bottom Layer w8: pad.4 3063.48,3604.33 v1(3077.23,3642.23)
NetC5_2: C5.2 pad.3 | length 107.4
  Top Layer w8: v1(3042.77,3637.23) 3042.81,3637.27 3042.81,3668.15 C5.2
  Bottom Layer w8: pad.3 3038.88,3604.33 v1(3042.77,3637.23)
NetC6_2: C6.2 pad.13 | length 173
  Top Layer w10: 3281.45,3518.72 cw(c3290.81,3522.23) 3281.07,3524.49 3281.08,3524.55 3282.03,3528.5 cw(c3291.74,3526.14) 3282.07,3528.68 3282.85,3531.63 ccw(c3260.13,3537.64) 3283.62,3536.94 v1(3284.35,3561.02)
  Top Layer w20: C6.2 3164.68,3520.08 3228.48,3510.23 ccw(c3231.53,3530) 3231.53,3510 3250.9,3510 cw(c3250.83,3490) 3254.58,3509.65 ccw(c3260.04,3537.62) 3261.85,3509.18 3264.71,3509.35 ; 3264.75,3509.36 ccw(c3263.45,3529.32) 3276.61,3514.25 3277.33,3514.88 cw(c3290.49,3499.82) 3277.95,3515.4 ccw(c3260.13,3537.64) 3281.45,3518.72
NetC7_2: C7.2 C8.2 pad.14 | length 144
  Top Layer w6: C7.2@3291.13,3469.44 3286.73,3467.22 3289.03,3474.6 v1(3308.56,3537.07) 3322.5,3509.72 C8.2@3330,3495 ; C8.2@3318.31,3483.16 C8.2
NetD1_1: D1.1 S1.3 S1.4 | length 565.6
  Top Layer w8: v1@2556.17,3023.47 D1.1
  Top Layer w10: S1.3 2696.47,2792.93 v1(2744.53,2744.84) 2792.59,2696.74 S1.4
  Layer 1 w8: v1(2555.71,3023.77) 2549.73,2964.64 ccw(c2572.11,2962.38) 2551.1,2954.33 2573.84,2894.99 ccw(c2594.85,2903.04) 2586.78,2882.04 2628.99,2865.83 cw(c2620.93,2844.83) 2637.41,2860.14 v1(2744.53,2744.84)
NetD2_2: D2.2 S2.3 S2.4 | length 854.9
  Top Layer w8: v1@2595.37,2902.84 D2.2
  Top Layer w10: S2.4 2951.85,2674.99 2985.25,2666.03 v1(3017.5,2657.35) 3083.18,2639.75 S2.3
  Layer 1 w8: v1(2594.85,2903.04) 2639.71,2876.13 cw(c2620.93,2844.83) 2645.64,2871.7 2764.38,2762.5 ccw(c2789.09,2789.36) 2764.55,2762.34 2976.04,2570.32 ccw(c3000.58,2597.35) 3034.86,2609.88 v1(3017.5,2657.35)
NetD3_1: D3.1 S3.3 S3.4 | length 1209.7
  Top Layer w8: v1@2572.61,2962.13 D3.1
  Top Layer w10: S3.3 3231.93,2578.84 v1(3297.61,2596.42) 3363.29,2613.99 S3.4
  Layer 1 w8: v1(2572.11,2962.38) 2773.68,2772.97 ccw(c2789.09,2789.36) 2773.99,2772.68 2985.43,2580.71 ccw(c3000.58,2597.35) 3019.97,2608.75 2998.1,2645.95 cw(c3017.5,2657.35) 3023.99,2678.89 v1(3297.61,2596.42)
NetD4_2: D4.2 S4.3 S4.4 | length 1389.6
  Top Layer w8: v1@2546.24,3086.19 D4.2
  Top Layer w10: S4.3 3506.28,2696.47 v1(3554.38,2744.53) 3602.47,2792.59 S4.4
  Layer 1 w8: v1(2545.81,3086.54) 2763.99,2864.6 ccw(c2800,2900) 2765.02,2863.58 2896.08,2737.54 ccw(c2925.19,2767.81) 2901.82,2732.91 2907.62,2729.04 ccw(c2930.92,2763.98) 2914.85,2725.18 2921.26,2722.53 ccw(c2937.29,2761.34) 2927.33,2720.54 3275.99,2635.41 ccw(c3281.33,2657.27) 3289.84,2636.44 v1(3554.38,2744.53)
NetD5_1: D5.1 S5.3 S5.4 | length 353
  Top Layer w10: S5.4 2573.16,3237.69 v1(2597.55,3301.16) 2621.94,3364.63 S5.3 ; v1(2720,3225) 2720,3238.71 cw(c2760.39,3238.71) D5.1
  Layer 2 w10: v1(2597.55,3301.16) 2640.34,3261.36 ccw(c2656.35,3278.56) 2646.91,3257.04 v1(2720,3225)
NetD6_2: D6.2 S6.3 S6.4 | length 396.3
  Top Layer w10: S6.4 2696.74,3506.62 v1(2744.84,3554.68) 2792.93,3602.74 S6.3 ; D6.2@2754.46,3326.37 2758.24,3333.26 v1(2773.51,3371.07)
  Layer 2 w10: v1(2744.84,3554.68) 2748.66,3491.47 ccw(c2772.11,3492.89) 2749.11,3488.09 v1(2773.51,3371.07)
NetIC3_1: IC3.1 IC4.1 R4.2 | length 293.4
  Top Layer w8: 2772.97,3010.01 ccw(c2780.57,3012.52) 2777.77,3005.02 2785.44,3002.2 ccw(c2788.16,3009.72) 2789.92,3001.92 cw(c2795,2980) 2813.23,2993.19 2814.03,2992.08 cw(c2807.55,2987.39) 2814.8,2990.78 2815.38,2989.54 cw(c2795,2980) 2811.02,2964.2 2790.61,2943.51 IC4.1 ; 2772.96,3010.04 2772.51,3011.42 ccw(c2761.1,3007.72) 2767.23,3018.03 cw(c2771.4,3024.86) 2765.83,3019.12 2735.42,3049.11 IC3.1 2735.15,3073.73 2745.68,3091.36 cw(c2752.55,3087.26) 2751.57,3095.2 2802.19,3101.4 R4.2
NetIC5_2: IC5.2 LS1.1 | length 252.1
  Top Layer w8: v1(3455,3240) LS1.1 ; v1(3457.56,3078.72) 3476.93,3059.35 3480.65,3059.35 3492.4,3047.6 IC5.2
  Layer 1 w8: v1(3455,3240) v1(3457.56,3078.72)
NetJ1_9: pad.9 R1.2 | length 170.1
  Top Layer w10: R1.2 3060.39,3530.66 ccw(c3053.3,3537.71) 3063.3,3537.71 3063.3,3537.91 cw(c3076.3,3537.91) 3073.87,3550.69 3091.75,3554.08 ccw(c3089.88,3563.91) 3096.71,3556.6 3108.69,3567.79 cw(c3135.31,3539.29) 3135.31,3578.29 3171.62,3578.29 ccw(c3171.62,3588.29) 3176.37,3579.5 v1(3186.52,3584.98)
NetJ1_12: pad.12 R2.2 | length 182.6
  Top Layer w20: R2.2 3101.15,3527.91 3118.53,3546.96 ccw(c3103.71,3560.38) 3120.31,3549.24 cw(c3135.31,3539.29) 3135.31,3557.29 3174.68,3557.29 cw(c3174.68,3539.29) 3178.82,3556.81 3208.17,3549.87 v1(3260.13,3537.64)
OLED_SW: IC1.1 IC5.1 R4.1 | length 1118.2
  Top Layer w8: v1(2795.91,3180.58) 2795.91,3175.98 2802.21,3169.68 2802.21,3155.43 R4.1 ; v1(2972.56,3434.1) 2976.8,3434.1 2985.75,3425.16 IC1.1 ; IC5.1 v1(3417.6,3087.6)
  Layer 1 w8: v1(2972.56,3434.1) 3104.06,3347.62 ccw(c3116.42,3366.42) 3123.09,3344.93 3202.3,3369.51 3203.71,3370.1 3218.69,3370.1 3234.21,3354.58 3234.71,3354.03 3390.46,3166.25 cw(c3379.69,3157.31) 3391.33,3165.09 3395.16,3159.36 cw(c3383.52,3151.58) 3396.45,3156.94 3399.09,3150.57 cw(c3386.15,3145.21) 3399.59,3149.14 v1(3417.6,3087.6)
  Bottom Layer w8: v1(2795.91,3180.58) cw(c2832.94,3180.58) 2806.76,3206.76 2808.79,3208.79 ccw(c2757.57,3260) 2830,3260 2830,3315 cw(c2905,3315) 2905,3390 ccw(c2905,3446.62) 2945.04,3406.58 v1(2972.56,3434.1)
PIN1: IC1.20 LED1.1 LED2.2 LED3.2 LED4.2 LED5.2 LED6.2 LED7.1 LED8.1 LED9.1 LED10.1 | length 1302
  Top Layer w8: 3198.26,3612.55 LED1.1 ; v1(3210.16,3425.16) IC1.20 ; 3246.39,3604.93 LED2.2 ; 3293.45,3592.32 LED3.2 ; 3338.94,3574.86 LED4.2 ; 3382.36,3552.74 LED5.2 ; 3423.22,3526.2 LED6.2 ; 3461.09,3495.54 LED7.1 ; 3495.54,3461.09 LED8.1 ; 3526.2,3423.22 LED9.1 ; v1(3552.74,3382.36) LED10.1
  Top Layer w15: 3199.35,3611.94 cw(c3149.61,3149.61) v1@3552.31,3382.11
  Layer 1 w8: v1(3210.16,3425.16) 3335.12,3422.06 cw(c3334.57,3399.57) 3338.63,3421.7 v1(3552.74,3382.36)
PIN2: IC1.15 LED1.2 LED2.1 LED11.2 LED12.2 LED13.2 LED14.2 LED15.1 LED16.1 LED17.1 LED18.1 | length 2237.3
  Top Layer w8: LED18.1 3149.61,2684.11 ; LED1.2 LED2.1 v1@3276.48,3746.51 ; v1(3210.16,3297.2) IC1.15 3290.7,3297.41 3360.02,3297.98 3376.13,3298.12 3393.66,3315.65 3583.78,3315.65 ; 3382.36,2746.47 LED17.1 ; 3552.74,2916.86 LED16.1 ; 3574.86,3338.94 LED11.2 ; 3592.32,3293.45 LED12.2 ; 3604.93,3246.39 LED13.2 ; 3612.55,3198.26 LED14.2 ; 3615.1,3149.61 LED15.1
  Top Layer w12: 3574.4,3338.74 cw(c3149.61,3149.61) 3585.94,3310.35 cw(c3149.61,3149.61) 3589.65,3299.88
  Top Layer w15: 3149.61,2684.61 ccw(c3149.61,3149.61) 3589.65,3299.88
  Layer 2 w8: v1(3210.16,3297.2) 3230.37,3338.49 ccw(c3210.16,3348.39) 3232.66,3348.45 3232.66,3425.09 ccw(c3210.16,3425.16) 3232.66,3425.37 3232.5,3464.97 ccw(c3210,3465) 3232.32,3467.87 3223.93,3532.98 cw(c3260.13,3537.64) 3224.82,3546.86 v1(3276.87,3746.43)
PIN3: IC1.14 LED3.1 LED7.2 LED11.1 LED15.2 LED19.2 LED20.2 LED21.2 LED22.1 LED23.1 LED24.1 | length 3480
  Top Layer w8: LED21.2 2684.11,3149.61 ; LED20.2 2746.47,2916.86 ; LED22.1@2706.71,3405.31 LED22.1 2746.47,3382.36 ; LED19.2 2916.86,2746.47 ; LED23.1 2893.82,3592.65 2915.79,3554.58 2916.86,3552.74 ; v1(3080,3720) 3113.3,3672.43 ccw(c3119.84,3677.04) 3117.87,3669.29 ; 3117.91,3669.28 3137.86,3664.33 LED24.1 3149.73,3661.29 3149.73,3614.98 ; v1@3189.67,3271.61 IC1.14 ; LED3.1 v1@3338.18,3729.98 ; LED7.2 v1@3557.93,3603.1 ; LED11.1 v1@3707.08,3397.81 ; LED15.2 v1@3759.84,3149.61
  Top Layer w15: 2916.09,2745.25 cw(c3145,3150) 2806.42,3468.73 ccw(c2795.46,3478.98) 2810.08,3482.34 2809.66,3484.17 cw(c2835,3490) 2844.3,3514.28 ccw(c2849.58,3528.32) 2858.81,3516.5 cw(c3145,3150) 2915.79,3554.58 cw(c3145,3150) 3149.73,3614.98
  Layer 2 w8: v1(3080,3720) 3133.4,3775.45 cw(c3149.61,3759.84) 3151.97,3782.22 3279.23,3768.8 cw(c3276.87,3746.43) 3289.99,3764.7 3338.28,3730.04 ccw(c3342.94,3736.54) 3338.51,3729.88 v1(3338.55,3729.85) 3335.59,3728.85 ccw(c3338.16,3721.27) 3331.06,3724.96 3240.12,3547.93 ccw(c3260.13,3537.64) 3237.82,3534.74 3246.19,3469.73 cw(c3210,3465) 3246.5,3465.04 3246.66,3425.4 cw(c3210.16,3425.16) 3246.66,3425.16 3246.66,3348.39 cw(c3210.16,3348.39) 3245.27,3338.4 3231.8,3291.05 cw(c3210.16,3297.2) 3214.13,3275.06 v1(3188.52,3270.46) ; v1@3338.58,3729.83 ccw(c3342.94,3736.55) 3343.07,3728.55 3397.81,3729.42 cw(c3398.17,3706.93) 3408.4,3726.97 3465.29,3697.93 cw(c3455.06,3677.89) 3467.33,3696.75 3520.88,3661.93 cw(c3508.61,3643.07) 3528.03,3654.43 v1(3558.23,3602.84) 3558.98,3602.08 ccw(c3564.61,3607.77) 3561.42,3600.43 3612.28,3578.3 cw(c3603.36,3557.64) 3620.86,3571.79 3661.02,3522.12 cw(c3643.53,3507.98) 3662.41,3520.22 3697.16,3466.63 cw(c3678.28,3454.38) 3700.66,3456.71 3706.51,3400.54 ccw(c3714.46,3401.37) 3706.76,3399.21 v1(3707.24,3397.45) 3746.93,3352.74 cw(c3730.1,3337.81) 3751.83,3343.62 3768.33,3281.91 cw(c3746.59,3276.1) 3768.81,3279.6 3778.77,3216.51 cw(c3756.54,3213) 3777.98,3206.18 v1(3759.84,3149.21)
PIN4: IC1.13 LED4.1 LED8.2 LED12.1 LED16.2 LED19.1 LED22.2 LED28.1 | length 4439.3
  Top Layer w8: v1(2621.13,3454.72) LED22.2 ; v1@2844.48,2621.13 LED19.1 ; LED28.1 v1(3215,2724.47) ; v1(3210.16,3246.02) IC1.13 ; LED4.1 v1@3397.81,3707.08 ; LED8.2 v1@3603.1,3557.93 ; LED16.2 v1@3678.09,2844.49 ; LED12.1 v1@3729.98,3338.18
  Layer 1 w8: v1(2621.13,3454.72) 2715.99,3577.05 cw(c2744.84,3554.68) 2718.58,3580.04 2828.35,3693.67 cw(c2844.54,3678.04) 2837.22,3699.31 2983.13,3749.51 cw(c2995,3715) 2992.86,3751.44 3077.89,3756.44 cw(c3080,3720) 3091.02,3754.8 3142.8,3738.4 ccw(c3149.61,3759.84) 3146.08,3737.62 3335.03,3707.63 ccw(c3338.55,3729.85) 3338.39,3707.35 v1(3398.17,3706.93) ; v1(3215,2724.47) 3358.05,2746.16 ccw(c3355.95,2760) 3358.68,2746.27 3365.48,2747.62 ccw(c3362.71,2761.34) 3368.07,2748.41 3374.44,2751.05 ccw(c3369.08,2763.98) 3374.97,2751.28 3500.38,2809.5 cw(c3509.85,2789.09) 3505.62,2811.19 v1(3677.89,2844.15)
  Layer 2 w8: v1@2845.19,2620.9 3141.85,2518.11 ccw(c3149.21,2539.37) 3171.14,2534.31 v1(3215,2724.47) ; v1(3398.17,3706.93) 3438.43,3662.74 ccw(c3455.06,3677.89) 3441.83,3659.7 3544.99,3584.64 ccw(c3558.23,3602.84) 3549.26,3582.2 3600.1,3560.12 cw(c3596.91,3552.78) 3602.57,3558.44 v1(3603.36,3557.64) 3603.91,3556.65 cw(c3596.91,3552.78) 3604.52,3555.25 3622.13,3501.03 ccw(c3643.53,3507.98) 3624.04,3496.74 3687.75,3386.22 ccw(c3707.24,3397.45) 3690.42,3382.52 v1(3730.1,3337.81)
  Bottom Layer w8: v1@2845.19,2620.9 cw(c2847.82,2628.45) 2844.72,2621.08 v1(2844.14,2621.33) 2843.64,2621.63 cw(c2847.82,2628.45) 2842.57,2622.41 2606.17,2827.85 cw(c2620.93,2844.83) 2600.4,2835.63 2574.31,2893.84 cw(c2594.85,2903.04) 2573.84,2894.99 2551.1,2954.33 cw(c2572.11,2962.38) 2550.37,2956.57 2533.97,3017.96 cw(c2555.71,3023.77) 2533.48,3020.27 2523.58,3083.03 cw(c2545.81,3086.54) 2523.42,3084.27 2516.99,3147.73 cw(c2539.37,3150) 2516.87,3150.41 2517.55,3187.4 cw(c2540.05,3186.99) 2517.93,3191.14 2547.7,3349.9 cw(c2569.81,3345.75) 2551.39,3358.66 2614.85,3449.2 cw(c2621.4,3444.61) 2616.34,3450.8 v1(2621.13,3454.72) 2760.22,3352.92 ccw(c2773.51,3371.07) 2791.78,3357.93 cw(c2810,3344.74) 2811.84,3367.16 2898.95,3360.01 cw(c2895.96,3323.63) 2901.86,3359.65 3145.02,3319.85 cw(c3141.38,3297.65) 3163.82,3299.31 3166.08,3268.8 ccw(c3188.52,3270.46) 3186.6,3248.04 v1(3210.16,3246.02)
PIN5: IC1.12 LED5.1 LED9.2 LED13.1 LED17.2 LED20.1 LED23.2 LED29.2 LED30.1 | length 4187.4
  Top Layer w8: v1@2621.47,2844.68 LED20.1 ; LED30.1 v1(2764.53,3179.53) ; v1(2844.54,3678.04) 2858.31,3654.17 LED23.2 ; v1@3189.67,3220.43 IC1.12 ; LED17.2 v1@3454.72,2621.13 ; LED5.1 v1@3454.72,3678.09 ; v1(3530.47,3115.47) LED29.2 ; LED9.2 v1@3643.3,3508.29 ; LED13.1 v1@3746.51,3276.48
  Layer 1 w8: v1(2620.93,2844.83) 2728.04,2729.52 ccw(c2744.53,2744.84) 2731.74,2726.33 2856.93,2639.84 cw(c2844.14,2621.33) 2857.43,2639.49 2970.76,2556.59 ccw(c3000.58,2597.35) 3005.79,2547.12 3146.89,2561.75 cw(c3149.21,2539.37) 3147.41,2561.8 3299.41,2573.99 ccw(c3297.61,2596.42) 3304.2,2574.91 v1(3454.38,2620.93) ; v1(2764.53,3179.53) 2710.53,3204.59 cw(c2720,3225) 2705.51,3207.78 2641.86,3261.35 cw(c2656.35,3278.56) 2634.92,3285.43 2723.41,3561.55 cw(c2744.84,3554.68) 2729.45,3571.1 2841.77,3676.35 cw(c2847.24,3670.51) v1(2844.54,3678.04) ccw(c2841.8,3685.56) 2844.81,3678.15 2986.52,3735.84 cw(c2995,3715) 2993.68,3737.46 3078.68,3742.46 cw(c3080,3720) 3086.79,3741.45 3138.59,3725.05 ccw(c3149.61,3759.84) 3143.88,3723.79 3332.83,3693.81 ccw(c3338.55,3729.85) 3333.24,3693.74 3394.89,3684.66 ccw(c3398.17,3706.93) 3395.66,3684.57 v1(3455.06,3677.89) 3457.13,3675.36 cw(c3450.93,3670.3) 3457.38,3675.03 3490.45,3629.79 ccw(c3508.61,3643.07) 3493.55,3626.36 3588.3,3540.93 ccw(c3603.36,3557.64) 3592.21,3538.1 3640.64,3510.47 cw(c3636.67,3503.52) 3642.33,3509.18 v1(3643.53,3507.98) 3644.15,3506.36 cw(c3636.67,3503.52) 3644.49,3505.19 3656.27,3449.71 ccw(c3678.28,3454.38) 3657.72,3445.25 3709.54,3328.67 ccw(c3730.1,3337.81) 3711.8,3324.71 v1(3746.59,3276.1) v1(3530.47,3115.47)
  Layer 2 w8: v1(2620.93,2844.83) v1(2764.53,3179.53) 2779.28,3195.73 cw(c2795.91,3180.58) 2795.99,3203.08 2974.93,3202.5 ccw(c2975,3225) 2979.3,3202.91 3090.86,3224.61 ccw(c3086.57,3246.7) 3091.06,3224.65 3134.1,3233.41 cw(c3141.38,3197.65) 3153.91,3231.93 v1(3188.52,3219.28)
PIN6: IC1.11 LED6.1 LED10.2 LED14.1 LED18.2 LED21.1 LED24.2 LED28.2 LED29.1 LED30.2 | length 3472.5
  Top Layer w8: v1@2539.37,3149.61 LED21.1 ; LED30.2 v1(2764.53,3120.47) ; v1(3084.79,2723.5) 3108.73,2723.52 LED28.2@3120.47,2724.47 ; v1@3149.61,2539.37 LED18.2 ; LED24.2 v1(3149.61,3759.84) ; v1(3210.16,3194.84) IC1.11 3290.7,3192.92 v1(3530.47,3174.53) LED29.1 ; LED6.1 v1@3508.29,3643.3 ; LED10.2 v1@3678.09,3454.72 ; LED14.1 v1@3756.5,3213.39
  Layer 1 w8: v1(2539.37,3150) v1(2764.53,3120.47) 2758.53,2981.57 ccw(c2795,2980) 2758.57,2977.72 2763.57,2897.72 ccw(c2800,2900) 2774.72,2873.67 2905.78,2747.63 ccw(c2925.19,2767.81) 2909.6,2744.55 2915.4,2740.68 ccw(c2930.92,2763.98) 2920.21,2738.11 2926.61,2735.46 ccw(c2937.29,2761.34) 2931.83,2733.88 2938.59,2732.54 ccw(c2944.05,2760) 2942.37,2732.05 v1(3084.79,2723.5) ; v1(3149.61,3759.84) 3275.25,3768.87 cw(c3276.87,3746.43) 3282.7,3768.16 3344.39,3751.58 cw(c3338.55,3729.85) 3346.63,3750.85 3406.25,3727.93 cw(c3398.17,3706.93) 3408.4,3726.97 3465.29,3697.93 cw(c3455.06,3677.89) 3473.19,3691.22 v1(3508.61,3643.07) 3565.33,3624.19 cw(c3558.23,3602.84) 3574.15,3618.74 3619.28,3573.54 cw(c3603.36,3557.64) 3620.86,3571.79 3661.02,3522.12 cw(c3643.53,3507.98) 3665.51,3512.78 v1(3678.28,3454.38) 3679.6,3452.87 ccw(c3685.66,3458.09) 3680.29,3452.16 3722.34,3414.14 cw(c3707.24,3397.45) 3728.26,3405.5 3751.11,3345.86 cw(c3730.1,3337.81) 3751.83,3343.62 3768.33,3281.91 cw(c3746.59,3276.1) 3768.62,3271.55 v1(3756.54,3213) 3541.24,3095.71 cw(c3530.47,3115.47) 3509.67,3124.04 v1(3530.47,3174.53)
  Layer 2 w8: v1(2764.53,3120.47) 2932.49,3181.81 cw(c2937.29,3168.65) 2934.56,3182.39 2941.32,3183.73 cw(c2944.05,3170) 2942.23,3183.88 2979.75,3188.81 ccw(c2975,3225) 2981.97,3189.17 3093.54,3210.87 ccw(c3086.57,3246.7) 3093.85,3210.93 3136.84,3219.68 cw(c3141.38,3197.65) 3154.46,3215.96 3175.45,3200.97 ccw(c3188.52,3219.28) 3186.6,3196.86 v1(3210.16,3194.84) ; v1(3084.79,2723.5) v1(3149.21,2539.37)
SWDCLK: IC1.19 pad.17@3350,3340 | length 132.4
  Top Layer w8: IC1.19 3330.43,3399.57 3350,3380 v1(3350,3340)
SWDIO: IC1.18 pad.17@3450,3340 | length 236.1
  Top Layer w8: IC1.18 3306.7,3373.98 3317.5,3363.18 3317.5,3330.68 3330.68,3317.5 3365,3317.5 3387.5,3340 v1(3450,3340)
UART2_RX: IC1.10 pad.17@3141.38,3197.65 | length 108.2
  Top Layer w8: IC1.10 3138.58,3194.84 v2(3141.38,3197.65)
UART2_TX: IC1.9 pad.17@3141.38,3297.65 | length 151.4
  Top Layer w8: IC1.9 3064.17,3220.43 ccw(c3064.17,3297.65) 3081.77,3222.47 3091.7,3224.79 ccw(c3086.57,3246.7) 3099.24,3228.11 3107.67,3233.85 ccw(c3064.17,3297.65) v2(3141.38,3297.65)
VBAT: IC2.1 IC2.3 IC3.3 IC5.3 pad.15 pad.17@2975,3225 | length 1668.8
  Top Layer w8: IC2.3 2937.81,3226.3 v2(2975,3225) ; v1(3425,3154.37) 3441.28,3138.09 3443.25,3138.09 3455,3126.34 IC5.3
  Top Layer w20: IC3.3 2818.07,3054.81 2828.65,3069.19 cw(c2844.71,3057.27) 2832.62,3073.2 ccw(c2821.81,3087.6) 2839.26,3083.19 2849.5,3123.05 ; IC2.1 2854.3,3209.02 2850.1,3127 cw(c2830.13,3128.03) 2849.5,3123.05 ; v3(2885,3080) 2885,3097.32 2871.05,3111.27 2861.29,3111.27 2849.5,3123.05
  Layer 1 w10: v2(2975,3225) 3086.19,3223.2 ccw(c3086.57,3246.7) 3102.57,3229.48 3157.38,3280.43 ccw(c3141.38,3297.65) 3146.9,3320.49 3107.63,3329.97 cw(c3116.42,3366.42) 3097.53,3334.03 2960.72,3413.8 cw(c2972.56,3434.1) 2953.89,3448.38 2981.33,3484.27 cw(c3000,3470) 3006.62,3492.55 3157.78,3448.15 cw(c3151.16,3425.6) 3169.98,3439.67 3191.33,3411.09 ccw(c3210.16,3425.16) 3195.86,3406.51 3227.82,3382 cw(c3218.69,3370.1) 3229.3,3380.7 3244.82,3365.18 cw(c3234.21,3354.58) 3245.3,3364.68 3245.8,3364.13 cw(c3234.71,3354.03) 3246.12,3363.77 v1(3425,3154.37)
  Bottom Layer w8: pad.15@2880,3080 2880.71,3080.71 ccw(c2810,3151.42) 2897.54,3103.08 ccw(c2890.5,3106.88) 2898.5,3106.84 2898.5,3138.45 cw(c2912.5,3138.45) 2898.77,3141.18 2900.11,3147.94 cw(c2913.84,3145.21) 2900.91,3150.57 2903.55,3156.94 cw(c2916.48,3151.58) 2904.1,3158.11 cw(c2916.48,3151.58) 2904.84,3159.36 2908.67,3165.09 cw(c2920.31,3157.31) 2910.44,3167.24 2915.26,3172.06 cw(c2925.19,3162.19) 2917.41,3173.83 2923.14,3177.66 cw(c2930.92,3166.02) 2925.56,3178.95 2931.93,3181.59 cw(c2937.29,3168.65) 2934.56,3182.39 2941.32,3183.73 cw(c2944.05,3170) 2944.05,3184 2945.07,3184 ccw(c2945.03,3192) 2946.07,3184.07 ccw(c2941.32,3217.41) 2975,3217.41 v2(2975,3225)
VBAT_oled: IC3.2 pad.5 | length 823.2
  Top Layer w10: IC3.2 2763.21,2985.03 v1(2795,2980)
  Bottom Layer w8: 3087.96,3484.98 3088.09,3484.98 pad.5
  Bottom Layer w20: v1(2795,2980) 2795,3068.58 cw(c2895,3068.58) 2818.81,3133.35 ; 2818.83,3133.37 ccw(c2803.55,3146.28) 2821.25,3136.97 2821.86,3138.12 cw(c2880,3107.56) 2835.54,3155.91 2836.71,3156.98 ccw(c2823.17,3171.7) 2841.13,3162.91 ccw(c2762.22,3201.36) 2850,3201.36 2850,3315 cw(c2905,3315) 2905,3370 3010,3370 ccw(c3010,3447.96) 3074.98,3404.88 ccw(c3058.31,3415.93) 3076.64,3407.94 cw(c3095,3400) 3078.72,3411.62 ccw(c3062.39,3423.17) 3080.47,3414.61 ccw(c3010,3447.96) 3087.96,3447.96 3087.96,3484.98
  other v1: 3088.88,3583.88
copper on no net: | length 27.9
  Top Layer w8: 2955,3605 2960,3605
  Bottom Layer w0.98: 3211.12,3561.02 3211.12,3583.88

## Polygon pours and split planes (outlines as drawn)
GND on Bottom Layer "NONET_L02_P-001" (solid, remove dead copper, pour order 1): 2490,3870 2505,3855 3865,3855 3865,2310 3860,2305 3765,2400 2435,2400
GND on Top Layer "NONET_L02_P-001" (solid, pour order 2): 2489.37,3868.54 2504.37,3853.54 3864.37,3853.54 3864.37,2308.54 3859.37,2303.54 3764.37,2398.54 2434.37,2398.54
GND on Layer 2 "NONET_L02_P-001" (solid, pour order 3): 2490,3875 2505,3860 3865,3860 3865,2315 3860,2310 3765,2405 2435,2405
GND on Layer 1 "NONET_L02_P-001" (solid, pour order 0): 2490,3870 2505,3855 3865,3855 3865,2310 3860,2305 3765,2400 2435,2400

## Silkscreen, mask and mechanical layers (free items; w line width, h text height)
Top Overlay:
  lines w8: 2975.46,3546.12 2975.2,3546.39 2953.42,3546.39 ; 2976.86,3191.24 2953.99,3191.24 2953.99,3217.06 ; 3327.72,3547.07 3348.34,3547.07 ; 3347.65,3213.4 3347.65,3190.74 3347.94,3190.45 ; 3348.34,3522.53 3348.34,3547.07 ; 2953.42,3546.39 2953.55,3546.26 2953.55,3518.01 2953.42,3518.14 2953.42,3546.39 ; 2953.99,3217.06 2953.99,3217.06 ; 3347.94,3190.45 3322.94,3190.45 3347.94,3190.45 ; 3348.34,3547.07 3348.34,3547.07
Bottom Overlay:
  circle w5: c3350,3340 r29.94
  circle w5: c3550,3340 r29.94
  circle w5: c3141.38,3297.65 r29.94
  circle w5: c3141.38,3197.65 r29.94
  circle w5: c3116.42,3366.42 r29.94
  circle w5: c2945,3305 r29.94
  circle w5: c2975,3225 r29.94
  circle w5: c3450,3340 r29.94
  circle w15: c3455,3485 r98.43
  circle w15: c3620,2985 r98.43
  circle w15: c3150,2625 r98.43
  circle w15: c2665,3040 r98.43
  circle w15: c2820,3520 r98.43
  text "-" at 3099.99,3345 h60 r90
  text "Tx" at 3285,3285 h60
  text "+" at 3010,3190 h60
  text "Rx" at 3285,3190 h60
  text "+" at 2855,3060 h60 r90
  text "-" at 2874.99,2840 h60 r90